# Altium PCB CH32H417QEU-R1.PcbDoc (part 4 of 6)
Units mil, origin at the board's own origin, x right, y up, seen from the top; angles counter-clockwise.
Board outline 4921.26 x 3346.46 mil, 4 copper layers (Top Layer, Layer 1, Layer 2, Bottom Layer), stack 23.756 mil thick; 271 components, 257 nets, 1065 pads, 927 vias.
Unrouted connection lines stored in the file: 149.
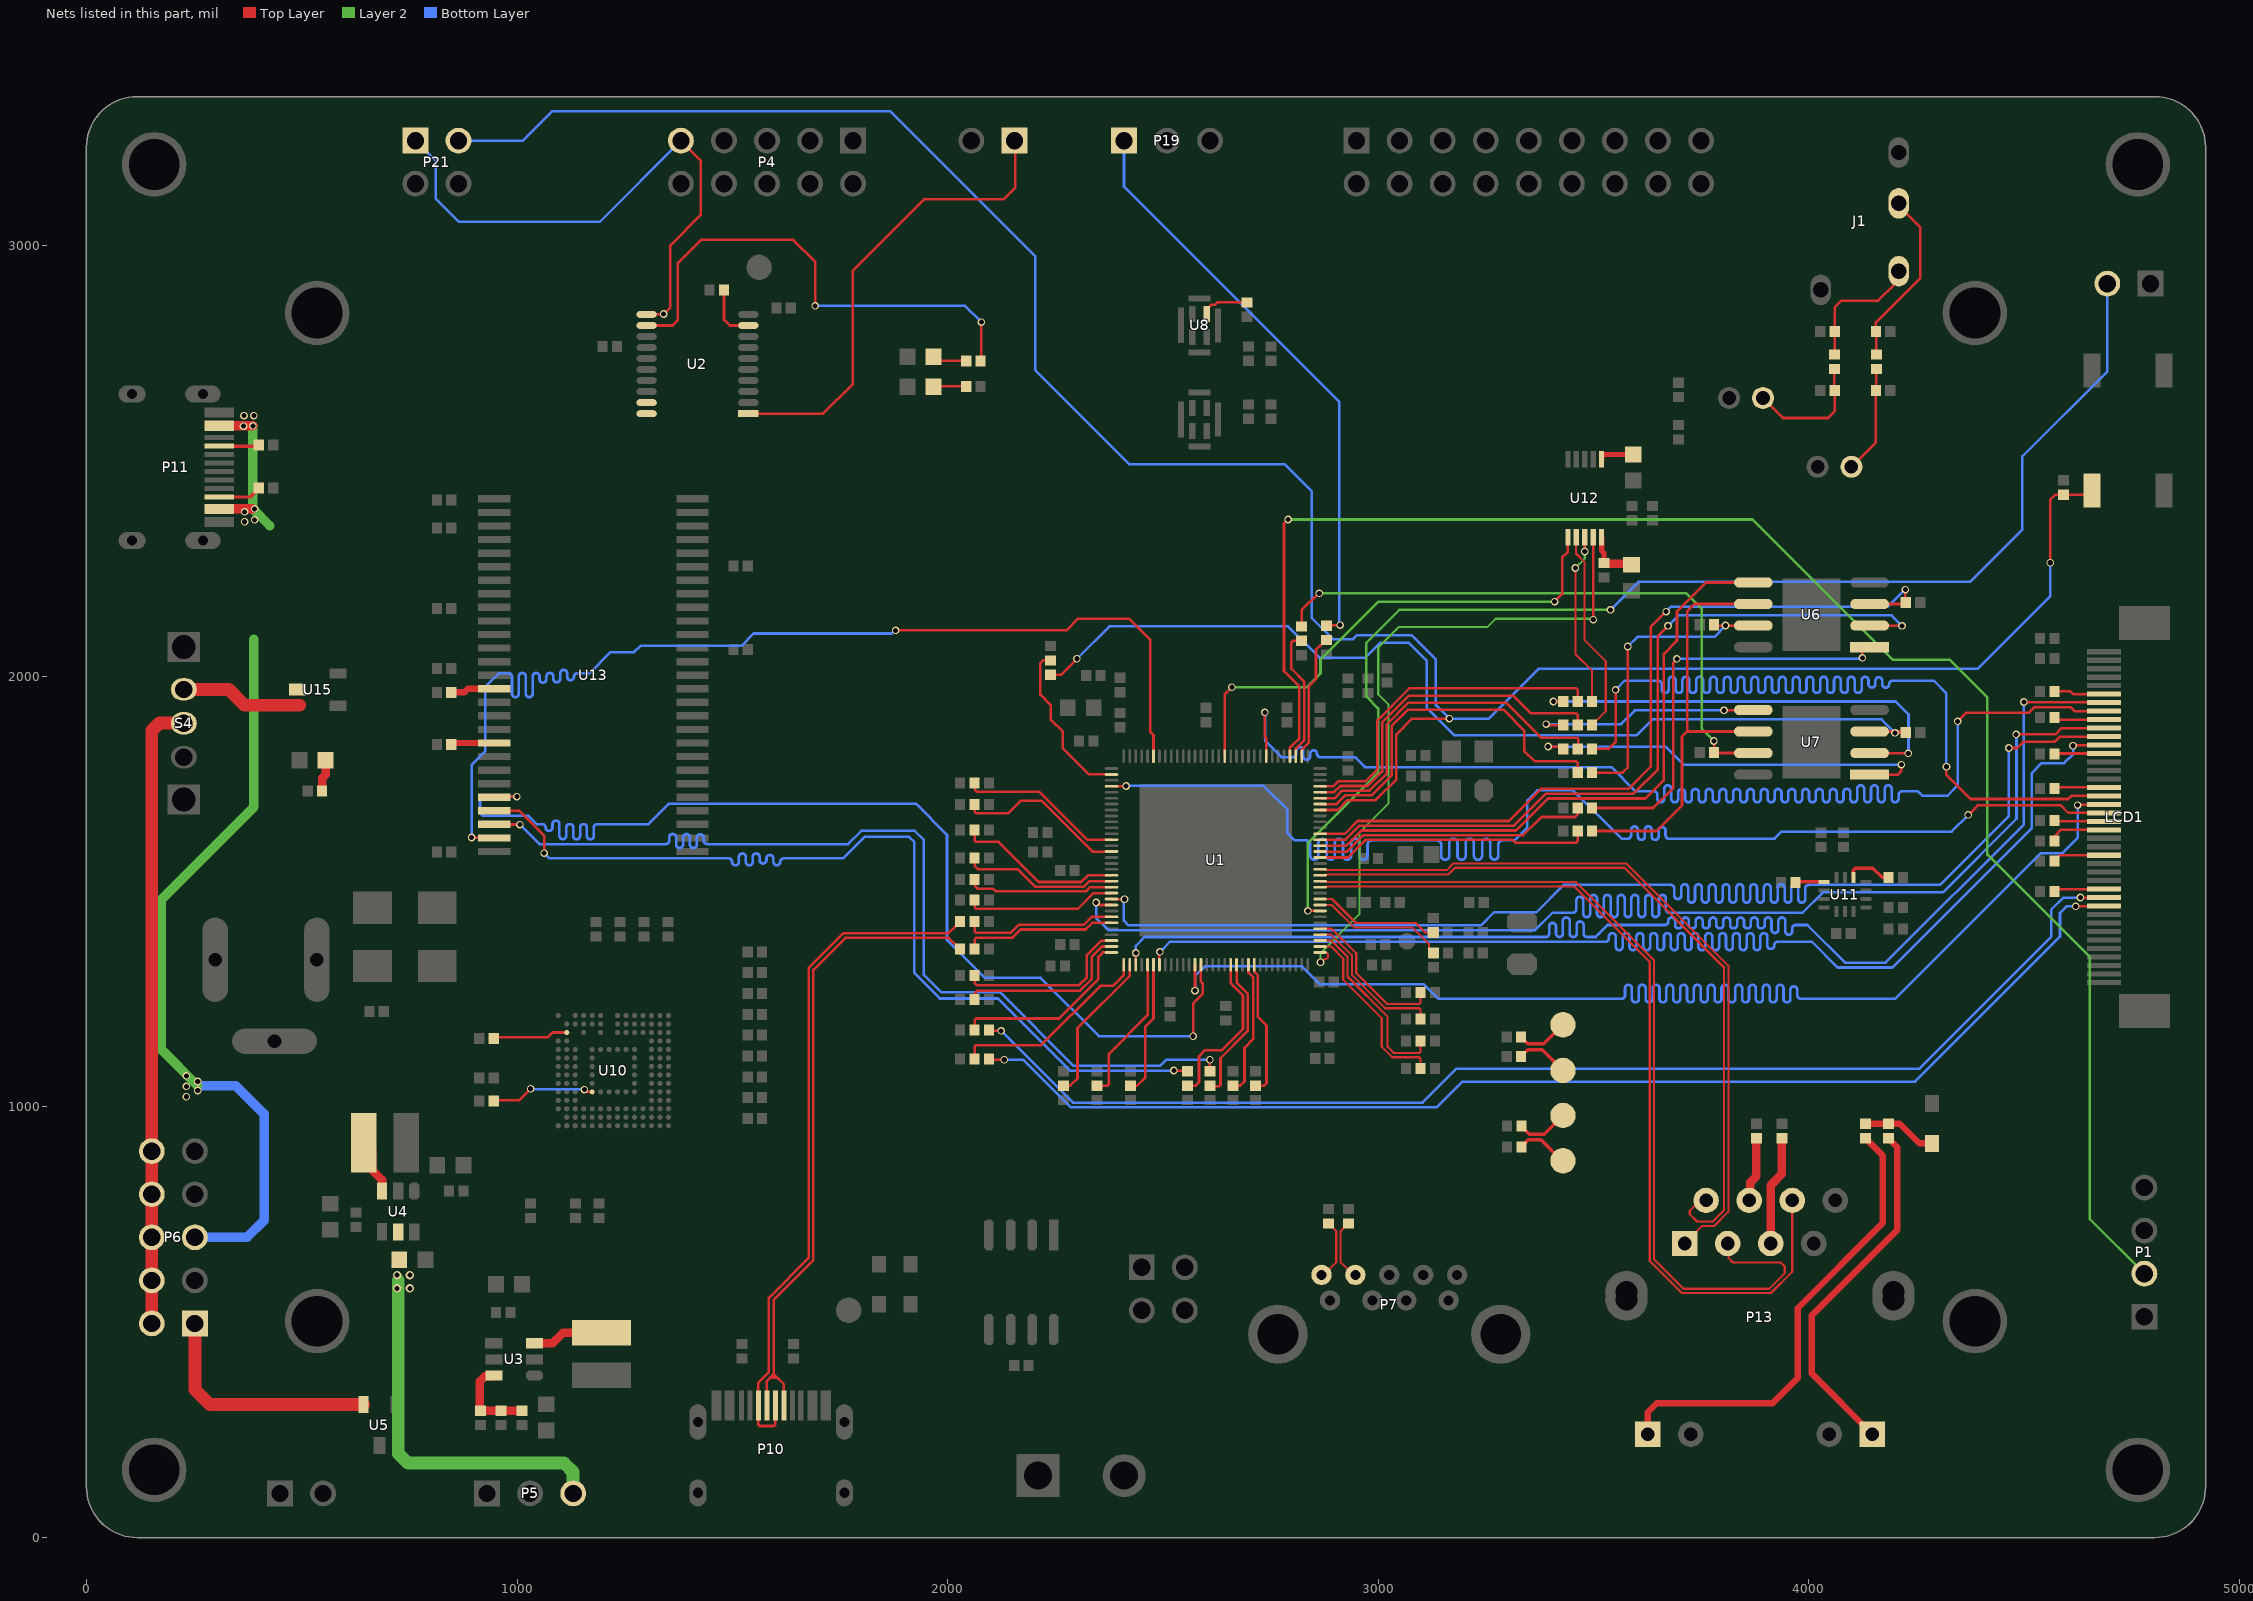
[diagram p6: the nets of this part, all layers, seen from the top]

## Via types
v1: diameter 17.72, hole 11.81, Top Layer to Bottom Layer, tented both sides, 558 vias
v2: diameter 19.68, hole 11.81, Top Layer to Bottom Layer, tented both sides, 320 vias
v3: diameter 28, hole 16, Top Layer to Bottom Layer, tented both sides, 24 vias
v4: diameter 20, hole 12, Top Layer to Bottom Layer, tented both sides, 22 vias
v5: diameter 27.56, hole 15.75, Top Layer to Bottom Layer, tented both sides, 3 vias

## Nets (pads, with @x,y where several pads share a name; then routed paths per layer and width w, separated by ;. In a path a pad name is that pad's centre, name@x,y a point inside that pad or via, vN(x,y) a via of type N, cw(c..) or ccw(c..) an arc to the next point about the centre after c; other vN are vias at no path point) (continued)
LCD_G5: LCD1.23 R66.1 | length 2521.8
  Top Layer w6: R66.1@3496.63,1831.64 3535.02,1831.64 3551.19,1847.82 v1(3551.19,1968.8) ; v1(4319.43,1790.1) 4319.43,1771.26 4375.53,1715.16 4602.27,1715.16 4609.57,1722.46 LCD1.23@4685,1722.46
  Bottom Layer w6: v1(3551.19,1968.8) 3572.24,1989.85 3631.37,1989.85 3650.37,1989.85 cw(c3650.37,1981.85) 3658.37,1981.85 3658.37,1969.58 ccw(c3666.37,1969.58) 3674.37,1969.58 3674.37,1990.98 cw(c3682.37,1990.98) 3690.37,1990.98 3690.37,1969.58 ccw(c3698.37,1969.58) 3706.37,1969.58 3706.37,1990.98 cw(c3714.37,1990.98) 3722.37,1990.98 3722.37,1969.58 ccw(c3730.37,1969.58) 3738.37,1969.58 3738.37,1990.98 cw(c3746.37,1990.98) 3754.37,1990.98 3754.37,1969.58 ccw(c3762.37,1969.58) 3770.37,1969.58 3770.37,1990.98 cw(c3778.37,1990.98) 3786.37,1990.98 3786.37,1969.58 ccw(c3794.37,1969.58) 3802.37,1969.58 3802.37,1990.98 cw(c3810.37,1990.98) 3818.37,1990.98 3818.37,1969.58 ccw(c3826.37,1969.58) 3834.37,1969.58 3834.37,1990.98 cw(c3842.37,1990.98) 3850.37,1990.98 3850.37,1969.58 ccw(c3858.37,1969.58) 3866.37,1969.58 3866.37,1990.98 cw(c3874.37,1990.98) 3882.37,1990.98 3882.37,1969.58 ccw(c3890.37,1969.58) 3898.37,1969.58 3898.37,1990.98 cw(c3906.37,1990.98) 3914.37,1990.98 3914.37,1969.58 ccw(c3922.37,1969.58) 3930.37,1969.58 3930.37,1990.98 cw(c3938.37,1990.98) 3946.37,1990.98 3946.37,1969.58 ccw(c3954.37,1969.58) 3962.37,1969.58 3962.37,1990.98 cw(c3970.37,1990.98) 3978.37,1990.98 3978.37,1969.58 ccw(c3986.37,1969.58) 3994.37,1969.58 3994.37,1990.98 cw(c4002.37,1990.98) 4010.37,1990.98 4010.37,1969.58 ccw(c4018.37,1969.58) 4026.37,1969.58 4026.37,1990.98 cw(c4034.37,1990.98) 4042.37,1990.98 4042.37,1969.58 ccw(c4050.37,1969.58) 4058.37,1969.58 4058.37,1990.98 cw(c4066.37,1990.98) 4074.37,1990.98 4074.37,1969.58 ccw(c4082.37,1969.58) 4090.37,1969.58 4090.37,1990.98 cw(c4098.37,1990.98) 4106.37,1990.98 4106.37,1969.58 ccw(c4114.37,1969.58) 4122.37,1969.58 4122.37,1990.98 cw(c4130.37,1990.98) 4138.37,1990.98 4138.37,1982.05 ccw(c4146.37,1982.05) 4154.37,1982.05 4154.37,1989.85 cw(c4162.37,1989.85) 4170.37,1989.85 4170.37,1981.85 ccw(c4178.37,1981.85) 4186.37,1981.85 cw(c4194.37,1981.85) 4194.37,1989.85 4213.06,1989.85 4290.2,1989.85 4319.43,1960.61 v1(4319.43,1790.1) v1@4319.43,1788.9
LCD_G6: LCD1.22 U1.109 | length 3330.7
  Top Layer w6: v1(2574.46,1270.17) 2574.46,1296.61 U1.109@2574.46,1330.38 ; v1(4624.04,1700.95) 4624.95,1701.86 4684.09,1701.86 LCD1.22@4685,1702.77
  Bottom Layer w6: v1(2574.46,1270.17) 2574.74,1270.45 2574.74,1303.92 2597.2,1326.38 2823.18,1326.38 2864.75,1284.81 3105.86,1284.81 3139.12,1251.55 3562.03,1251.55 3565.03,1251.55 ccw(c3565.03,1259.55) 3573.03,1259.55 3573.03,1275.69 cw(c3581.03,1275.69) 3589.03,1275.69 3589.03,1251.01 ccw(c3597.03,1251.01) 3605.03,1251.01 3605.03,1275.69 cw(c3613.03,1275.69) 3621.03,1275.69 3621.03,1251.01 ccw(c3629.03,1251.01) 3637.03,1251.01 3637.03,1275.69 cw(c3645.03,1275.69) 3653.03,1275.69 3653.03,1251.01 ccw(c3661.03,1251.01) 3669.03,1251.01 3669.03,1275.69 cw(c3677.03,1275.69) 3685.03,1275.69 3685.03,1251.01 ccw(c3693.03,1251.01) 3701.03,1251.01 3701.03,1275.69 cw(c3709.03,1275.69) 3717.03,1275.69 3717.03,1251.01 ccw(c3725.03,1251.01) 3733.03,1251.01 3733.03,1275.69 cw(c3741.03,1275.69) 3749.03,1275.69 3749.03,1251.01 ccw(c3757.03,1251.01) 3765.03,1251.01 3765.03,1275.69 cw(c3773.03,1275.69) 3781.03,1275.69 3781.03,1251.01 ccw(c3789.03,1251.01) 3797.03,1251.01 3797.03,1275.69 cw(c3805.03,1275.69) 3813.03,1275.69 3813.03,1251.01 ccw(c3821.03,1251.01) 3829.03,1251.01 3829.03,1275.69 cw(c3837.03,1275.69) 3845.03,1275.69 3845.03,1251.01 ccw(c3853.03,1251.01) 3861.03,1251.01 3861.03,1275.69 cw(c3869.03,1275.69) 3877.03,1275.69 3877.03,1251.01 ccw(c3885.03,1251.01) 3893.03,1251.01 3893.03,1275.69 cw(c3901.03,1275.69) 3909.03,1275.69 3909.03,1251.01 ccw(c3917.03,1251.01) 3925.03,1251.01 3925.03,1275.69 cw(c3933.03,1275.69) 3941.03,1275.69 3941.03,1251.01 ccw(c3949.03,1251.01) 3957.03,1251.01 3957.03,1272.04 cw(c3965.03,1272.04) 3973.03,1272.04 3973.03,1259.55 ccw(c3981.03,1259.55) 3981.03,1251.55 4004.25,1251.55 4200.99,1251.55 4539.16,1589.72 4588.77,1589.72 4624.04,1624.99 v1(4624.04,1700.95)
LCD_G7: LCD1.21 U1.68 | length 3330.3
  Top Layer w6: U1.68@2380.56,1744.75 U1.68@2380.56,1744.75 2413.86,1744.81 v1(2414.36,1745.31) ; v1(4370.18,1678.44) 4385.4,1693.66 4392.51,1700.77 4584.64,1700.77 4602.33,1683.09 LCD1.21@4685,1683.09
  Bottom Layer w6: v1(2414.36,1745.31) 2414.63,1745.58 2733.47,1745.58 2788.74,1690.31 2788.74,1636.01 2801.03,1623.72 2805.68,1619.07 2832.53,1619.07 cw(c2832.53,1609.57) 2842.03,1609.57 2842.03,1583.57 ccw(c2851.53,1583.57) 2861.03,1583.57 2861.03,1613.22 cw(c2870.53,1613.22) 2880.03,1613.22 2880.03,1583.57 ccw(c2889.53,1583.57) 2899.03,1583.57 2899.03,1613.22 cw(c2908.53,1613.22) 2918.03,1613.22 2918.03,1583.57 ccw(c2927.53,1583.57) 2937.03,1583.57 2937.03,1613.22 cw(c2946.53,1613.22) 2956.03,1613.22 2956.03,1583.57 ccw(c2965.53,1583.57) 2975.03,1583.57 2975.03,1609.57 cw(c2984.53,1609.57) 2984.53,1619.07 3136.53,1619.07 cw(c3136.53,1609.57) 3146.03,1609.57 3146.03,1583.57 ccw(c3155.53,1583.57) 3165.03,1583.57 3165.03,1613.22 cw(c3174.53,1613.22) 3184.03,1613.22 3184.03,1583.57 ccw(c3193.53,1583.57) 3203.03,1583.57 3203.03,1613.22 cw(c3212.53,1613.22) 3222.03,1613.22 3222.03,1583.57 ccw(c3231.53,1583.57) 3241.03,1583.57 3241.03,1613.22 cw(c3250.53,1613.22) 3260.03,1613.22 3260.03,1583.96 ccw(c3269.53,1583.96) 3279.03,1583.96 3279.03,1609.57 cw(c3288.53,1609.57) 3288.53,1619.07 3311.96,1619.07 3316.16,1619.07 3346.42,1649.33 3346.42,1712.24 3369.6,1735.42 3452.66,1735.42 3565,1623.08 3576.04,1623.08 3579.04,1623.08 ccw(c3579.04,1631.08) 3587.04,1631.08 3587.04,1643.59 cw(c3595.04,1643.59) 3603.04,1643.59 3603.04,1628.39 ccw(c3611.04,1628.39) 3619.04,1628.39 3619.04,1643.59 cw(c3627.04,1643.59) 3635.04,1643.59 3635.04,1628.39 ccw(c3643.04,1628.39) 3651.04,1628.39 3651.04,1642.1 cw(c3659.04,1642.1) 3667.04,1642.1 3667.04,1631.08 ccw(c3675.04,1631.08) 3675.04,1623.08 3703.36,1623.08 3920.28,1623.08 3936.6,1639.4 4331.14,1639.4 v1(4370.18,1678.44)
LCD_HS: LCD1.11 R32.1 | length 2892.9
  Top Layer w6: R32.1@2095.96,1178.41 2097.61,1176.76 v1(2124.31,1176.76) ; v1(4630.42,1486.35) 4630.47,1486.29 4684.94,1486.29 LCD1.11@4685,1486.24
  Bottom Layer w6: v1(2124.31,1176.76) 2124.66,1176.76 2291.18,1010.24 3102.71,1010.24 3181.71,1089.24 4257.02,1089.24 4562.76,1394.99 4562.76,1458.04 4591.07,1486.35 v1(4630.42,1486.35)
LCD_R3: LCD1.34 U1.99 | length 3330.6
  Top Layer w6: U1.99@2436.67,1330.38 U1.99@2436.67,1330.38 2436.72,1357.2 v1(2437.09,1357.57) ; v1(4499.1,1940.61) 4499.91,1939.8 4684.19,1939.8 LCD1.34@4685,1938.99
  Bottom Layer w6: v1(2437.09,1357.57) 2437.09,1374.47 2457.36,1394.74 3321.75,1394.74 3388.75,1394.74 ccw(c3388.75,1402.74) 3396.75,1402.74 3396.75,1419.44 cw(c3404.75,1419.44) 3412.75,1419.44 3412.75,1402.74 ccw(c3420.75,1402.74) 3428.75,1402.74 3428.75,1432.08 cw(c3436.75,1432.08) 3444.75,1432.08 3444.75,1402.74 ccw(c3452.75,1402.74) 3460.75,1402.74 3460.75,1422.81 cw(c3468.75,1422.81) 3476.75,1422.81 3476.75,1402.74 ccw(c3484.75,1402.74) 3484.75,1394.74 3504.66,1394.74 3512.54,1402.61 3532.58,1422.66 3662.28,1422.66 3665.28,1422.66 ccw(c3665.28,1430.66) 3673.28,1430.66 3673.28,1432.08 cw(c3681.28,1432.08) 3689.28,1432.08 3689.28,1422.68 ccw(c3697.28,1422.68) 3705.28,1422.68 3705.28,1432.08 cw(c3713.28,1432.08) 3721.28,1432.08 3721.28,1422.68 ccw(c3729.28,1422.68) 3737.28,1422.68 3737.28,1432.08 cw(c3745.28,1432.08) 3753.28,1432.08 3753.28,1422.68 ccw(c3761.28,1422.68) 3769.28,1422.68 3769.28,1432.08 cw(c3777.28,1432.08) 3785.28,1432.08 3785.28,1422.68 ccw(c3793.28,1422.68) 3801.28,1422.68 3801.28,1432.08 cw(c3809.28,1432.08) 3817.28,1432.08 3817.28,1422.68 ccw(c3825.28,1422.68) 3833.28,1422.68 3833.28,1432.08 cw(c3841.28,1432.08) 3849.28,1432.08 3849.28,1422.68 ccw(c3857.28,1422.68) 3865.28,1422.68 3865.28,1432.08 cw(c3873.28,1432.08) 3881.28,1432.08 3881.28,1422.68 ccw(c3889.28,1422.68) 3897.28,1422.68 3897.28,1432.08 cw(c3905.28,1432.08) 3913.28,1432.08 3913.28,1412.03 ccw(c3921.28,1412.03) 3929.28,1412.03 3929.28,1432.08 cw(c3937.28,1432.08) 3945.28,1432.08 3945.28,1408.16 ccw(c3953.28,1408.16) 3961.28,1408.16 3961.28,1414.66 cw(c3969.28,1414.66) 3969.28,1422.66 3996.38,1422.66 3999.29,1419.75 4084.02,1335.02 4178,1335.02 4499.1,1656.11 v1(4499.1,1940.61)
LCD_R4: LCD1.33 U1.40 | length 3328.3
  Top Layer w6: v1(2736.52,1916.47) 2736.84,1916.15 2736.84,1860.04 2739.81,1857.07 U1.40@2739.81,1814.64 ; v1(4345.43,1895.44) 4365.99,1915.99 4511.08,1915.99 4523.08,1927.99 4608.3,1927.99 4616.98,1919.31 LCD1.33@4685,1919.31
  Bottom Layer w6: v1(2736.52,1916.47) 2737.62,1915.37 2737.62,1849.79 2775.09,1812.32 2798.7,1812.32 2801.7,1812.32 ccw(c2801.7,1820.32) 2809.7,1820.32 2809.7,1827.61 cw(c2817.7,1827.61) 2825.7,1827.61 2825.7,1814.67 ccw(c2833.7,1814.67) 2841.7,1814.67 2841.7,1820.32 cw(c2849.7,1820.32) 2857.7,1820.32 ccw(c2865.7,1820.32) 2865.7,1812.32 2921.47,1812.32 2945.87,1812.32 2969.15,1789.04 3541.39,1789.04 3597.37,1733.06 3621.32,1733.06 3640.32,1733.06 cw(c3640.32,1725.06) 3648.32,1725.06 3648.32,1715.67 ccw(c3656.32,1715.67) 3664.32,1715.67 3664.32,1738.99 cw(c3672.32,1738.99) 3680.32,1738.99 3680.32,1715.67 ccw(c3688.32,1715.67) 3696.32,1715.67 3696.32,1730.46 cw(c3704.32,1730.46) 3712.32,1730.46 3712.32,1715.67 ccw(c3720.32,1715.67) 3728.32,1715.67 3728.32,1730.46 cw(c3736.32,1730.46) 3744.32,1730.46 3744.32,1715.67 ccw(c3752.32,1715.67) 3760.32,1715.67 3760.32,1730.46 cw(c3768.32,1730.46) 3776.32,1730.46 3776.32,1715.67 ccw(c3784.32,1715.67) 3792.32,1715.67 3792.32,1730.46 cw(c3800.32,1730.46) 3808.32,1730.46 3808.32,1715.67 ccw(c3816.32,1715.67) 3824.32,1715.67 3824.32,1730.46 cw(c3832.32,1730.46) 3840.32,1730.46 3840.32,1715.67 ccw(c3848.32,1715.67) 3856.32,1715.67 3856.32,1730.46 cw(c3864.32,1730.46) 3872.32,1730.46 3872.32,1715.67 ccw(c3880.32,1715.67) 3888.32,1715.67 3888.32,1730.46 cw(c3896.32,1730.46) 3904.32,1730.46 3904.32,1715.67 ccw(c3912.32,1715.67) 3920.32,1715.67 3920.32,1730.46 cw(c3928.32,1730.46) 3936.32,1730.46 3936.32,1715.67 ccw(c3944.32,1715.67) 3952.32,1715.67 3952.32,1730.46 cw(c3960.32,1730.46) 3968.32,1730.46 3968.32,1715.67 ccw(c3976.32,1715.67) 3984.32,1715.67 3984.32,1730.46 cw(c3992.32,1730.46) 4000.32,1730.46 4000.32,1715.67 ccw(c4008.32,1715.67) 4016.32,1715.67 4016.32,1730.46 cw(c4024.32,1730.46) 4032.32,1730.46 4032.32,1715.67 ccw(c4040.32,1715.67) 4048.32,1715.67 4048.32,1730.46 cw(c4056.32,1730.46) 4064.32,1730.46 4064.32,1715.67 ccw(c4072.32,1715.67) 4080.32,1715.67 4080.32,1730.99 cw(c4088.32,1730.99) 4096.32,1730.99 4096.32,1715.67 ccw(c4104.32,1715.67) 4112.32,1715.67 4112.32,1738.99 cw(c4120.32,1738.99) 4128.32,1738.99 4128.32,1715.67 ccw(c4136.32,1715.67) 4144.32,1715.67 4144.32,1738.99 cw(c4152.32,1738.99) 4160.32,1738.99 4160.32,1715.67 ccw(c4168.32,1715.67) 4176.32,1715.67 4176.32,1738.99 cw(c4184.32,1738.99) 4192.32,1738.99 4192.32,1715.67 ccw(c4200.32,1715.67) 4208.32,1715.67 4208.32,1725.06 cw(c4216.32,1725.06) 4216.32,1733.06 4253.26,1733.06 4258.24,1728.08 4263.23,1723.09 4322.46,1723.09 4345.43,1746.07 v1(4345.43,1895.44)
LCD_R5: LCD1.31 U1.88 | length 3331
  Top Layer w6: v1(2344.85,1474.76) 2348.02,1474.76 2353.62,1469.16 U1.88@2380.56,1469.16 ; v1(4481.24,1865.44) 4572.41,1865.44 4586.91,1879.94 LCD1.31@4685,1879.94
  Bottom Layer w6: v1(2344.85,1474.76) 2344.85,1438.93 2373.08,1410.69 3364.44,1410.69 3404.83,1451.08 3418.65,1451.08 3451.95,1451.08 ccw(c3451.95,1459.08) 3459.95,1459.08 3459.95,1480.18 cw(c3467.95,1480.18) 3475.95,1480.18 3475.95,1449.02 ccw(c3483.95,1449.02) 3491.95,1449.02 3491.95,1484.41 cw(c3499.95,1484.41) 3507.95,1484.41 3507.95,1449.02 ccw(c3515.95,1449.02) 3523.95,1449.02 3523.95,1484.41 cw(c3531.95,1484.41) 3539.95,1484.41 3539.95,1449.02 ccw(c3547.95,1449.02) 3555.95,1449.02 3555.95,1484.41 cw(c3563.95,1484.41) 3571.95,1484.41 3571.95,1449.02 ccw(c3579.95,1449.02) 3587.95,1449.02 3587.95,1484.41 cw(c3595.95,1484.41) 3603.95,1484.41 3603.95,1449.02 ccw(c3611.95,1449.02) 3619.95,1449.02 3619.95,1484.41 cw(c3627.95,1484.41) 3635.95,1484.41 3635.95,1449.02 ccw(c3643.95,1449.02) 3651.95,1449.02 3651.95,1484.41 cw(c3659.95,1484.41) 3667.95,1484.41 3667.95,1459.08 ccw(c3675.95,1459.08) 3675.95,1451.08 3694.95,1451.08 3985.46,1451.08 4032.76,1498.38 4311.12,1498.38 4482.11,1669.38 4482.11,1864.56 v1(4481.24,1865.44)
LCD_R6: LCD1.30 U1.87 | length 3330.3
  Top Layer w6: U1.87@2380.56,1482.94 U1.87@2380.56,1482.94 2410.04,1482.89 v1(2410.56,1482.37) ; v1(4464.26,1833.6) 4483.85,1833.6 4498.3,1848.05 4570.58,1848.05 4582.78,1860.25 4603.37,1860.25 LCD1.30@4685,1860.25
  Bottom Layer w6: v1(2410.56,1482.37) 2409.19,1481 2409.19,1432.56 2420.06,1421.69 3238.54,1421.69 3269.07,1452.22 3366.91,1452.22 3430.4,1515.71 3649.55,1515.71 3679.52,1515.71 cw(c3679.52,1507.71) 3687.52,1507.71 3687.52,1490.89 ccw(c3695.52,1490.89) 3703.52,1490.89 3703.52,1509.17 cw(c3711.52,1509.17) 3719.52,1509.17 3719.52,1482.57 ccw(c3727.52,1482.57) 3735.52,1482.57 3735.52,1509.17 cw(c3743.52,1509.17) 3751.52,1509.17 3751.52,1482.57 ccw(c3759.52,1482.57) 3767.52,1482.57 3767.52,1509.17 cw(c3775.52,1509.17) 3783.52,1509.17 3783.52,1482.57 ccw(c3791.52,1482.57) 3799.52,1482.57 3799.52,1509.17 cw(c3807.52,1509.17) 3815.52,1509.17 3815.52,1482.57 ccw(c3823.52,1482.57) 3831.52,1482.57 3831.52,1509.17 cw(c3839.52,1509.17) 3847.52,1509.17 3847.52,1482.57 ccw(c3855.52,1482.57) 3863.52,1482.57 3863.52,1509.17 cw(c3871.52,1509.17) 3879.52,1509.17 3879.52,1482.57 ccw(c3887.52,1482.57) 3895.52,1482.57 3895.52,1509.17 cw(c3903.52,1509.17) 3911.52,1509.17 3911.52,1482.57 ccw(c3919.52,1482.57) 3927.52,1482.57 3927.52,1509.17 cw(c3935.52,1509.17) 3943.52,1509.17 3943.52,1482.57 ccw(c3951.52,1482.57) 3959.52,1482.57 3959.52,1509.17 cw(c3967.52,1509.17) 3975.52,1509.17 3975.52,1482.57 ccw(c3983.52,1482.57) 3991.52,1482.57 3991.52,1507.71 cw(c3999.52,1507.71) 3999.52,1515.71 4002.52,1515.71 4304.46,1515.71 4464.26,1675.51 v1(4464.26,1833.6)
LCD_R7: LCD1.29 U1.103 | length 3330.9
  Top Layer w6: U1.103@2491.78,1330.38 U1.103@2491.78,1330.38 2491.84,1359.34 v1(2492.77,1360.27) ; v1(4613.46,1838.98) 4614.25,1839.77 4684.2,1839.77 LCD1.29@4685,1840.57
  Bottom Layer w6: v1(2492.77,1360.27) 2516.24,1383.74 3524.49,1383.74 3527.49,1383.74 ccw(c3527.49,1391.74) 3535.49,1391.74 3535.49,1395.68 cw(c3543.49,1395.68) 3551.49,1395.68 3551.49,1372.05 ccw(c3559.49,1372.05) 3567.49,1372.05 3567.49,1395.68 cw(c3575.49,1395.68) 3583.49,1395.68 3583.49,1372.05 ccw(c3591.49,1372.05) 3599.49,1372.05 3599.49,1395.68 cw(c3607.49,1395.68) 3615.49,1395.68 3615.49,1372.05 ccw(c3623.49,1372.05) 3631.49,1372.05 3631.49,1395.68 cw(c3639.49,1395.68) 3647.49,1395.68 3647.49,1372.05 ccw(c3655.49,1372.05) 3663.49,1372.05 3663.49,1395.68 cw(c3671.49,1395.68) 3679.49,1395.68 3679.49,1372.05 ccw(c3687.49,1372.05) 3695.49,1372.05 3695.49,1395.68 cw(c3703.49,1395.68) 3711.49,1395.68 3711.49,1372.05 ccw(c3719.49,1372.05) 3727.49,1372.05 3727.49,1395.68 cw(c3735.49,1395.68) 3743.49,1395.68 3743.49,1372.05 ccw(c3751.49,1372.05) 3759.49,1372.05 3759.49,1395.68 cw(c3767.49,1395.68) 3775.49,1395.68 3775.49,1372.05 ccw(c3783.49,1372.05) 3791.49,1372.05 3791.49,1395.68 cw(c3799.49,1395.68) 3807.49,1395.68 3807.49,1372.05 ccw(c3815.49,1372.05) 3823.49,1372.05 3823.49,1395.68 cw(c3831.49,1395.68) 3839.49,1395.68 3839.49,1372.05 ccw(c3847.49,1372.05) 3855.49,1372.05 3855.49,1395.68 cw(c3863.49,1395.68) 3871.49,1395.68 3871.49,1372.05 ccw(c3879.49,1372.05) 3887.49,1372.05 3887.49,1395.68 cw(c3895.49,1395.68) 3903.49,1395.68 3903.49,1375.09 ccw(c3911.49,1375.09) 3919.49,1375.09 3919.49,1375.74 cw(c3927.49,1375.74) 3927.49,1383.74 3990.71,1383.74 4006.91,1383.74 4066.62,1324.02 4193.91,1324.02 4517.07,1647.18 4517.07,1774.81 4540.62,1798.36 4592.92,1798.36 4613.46,1818.9 v1(4613.46,1838.98)
LCD_VS: LCD1.10 R36.1 | length 2861.3
  Top Layer w6: R36.1@2095.96,1111.04 2097.37,1109.63 v1(2131.46,1109.63) ; v1(4619.71,1465.83) 4620.43,1466.55 LCD1.10@4685,1466.55
  Bottom Layer w6: v1(2131.46,1109.63) 2176.23,1109.63 2286.62,999.24 3135.62,999.24 3195.28,1058.9 4246.5,1058.9 4583.13,1395.53 4583.13,1450.77 4598.2,1465.83 v1(4619.71,1465.83)
LDO_3V3: C40.2 P5.3 U4.5 | length 875.7
  Layer 2 w30: 724.22,597.71 724.22,195.41 746.49,173.14 1109.13,173.14 1130.43,151.83 P5.3@1130.43,102.71
  other v2: 721.42,578.85 751.22,578.85 721.42,609.57 751.22,609.57
LED_CON: R83.1 U2.12 | length 1167.5
  Top Layer w6: U2.12@1300.92,2814.87 1361.35,2814.87 1373.73,2827.26 1373.73,2959.91 1427.71,3013.88 1641.28,3013.88 1692.24,2962.93 1692.24,2860.49 v1(1692.4,2860.33) ; R83.1@2076.52,2732.6 2078.29,2734.37 v1(2078.29,2822.59)
  Bottom Layer w6: v1(1692.4,2860.33) 2040.54,2860.33 v1(2078.29,2822.59)
Link_5V: P6.5 P11.A4 P11.B4 | length 2170.2
  Top Layer w22: P11.B4@308.88,2388.97 v1@386.66,2388.97 ; P11.A4@308.88,2581.88 386.28,2581.88 v1(386.43,2581.73)
  Layer 2 w22: 258.67,1049.13 174.36,1133.44 174.36,1481.85 389.11,1696.6 389.11,2086.6 ; v1(386.43,2581.73) 386.43,2389.2 386.66,2388.97 425.82,2349.81
  Bottom Layer w22: P6.5@251.84,697.38 373.32,697.38 412.64,736.69 412.64,983.85 347.36,1049.13 258.67,1049.13
  other v1: 232.13,1023.89 258.67,1038.37 232.13,1048.02 258.67,1059.13 232.13,1072.16 367.32,2358.98 390.66,2363.48 367.32,2382.18 390.66,2388.97 364.9,2581.16 365.91,2605.63 388.91,2605.63
LOUT: C67.2 J1.3 R120.2 | length 398.4
  Top Layer w6: R120.2@4156.47,2747.36 4156.47,2800.31 C67.2@4155.49,2801.3 4155.49,2821.76 4258.85,2925.13 4258.85,3042.07 J1.3@4216.12,3084.8
MDIRN: P13.6 U1.12 | length 2081.4
  Top Layer w5: U1.12@2864.81,1510.5 2877.76,1510.5 2879.65,1512.39 3454.72,1512.39 3630.31,1336.8 3630.31,642.37 3704.69,567.99 3912,567.99 3961.34,617.33 P13.6@3961.34,782.99
MDIRP: P13.3 U1.13 | length 2081.5
  Top Layer w5: U1.13@2864.81,1524.28 2877.76,1524.28 2879.65,1522.39 3458.87,1522.39 3640.31,1340.95 3640.31,646.51 3708.83,577.99 3907.85,577.99 3944,614.14 3944,629.56 3934.57,638.99 3929.97,638.99 ; P13.3@3811.34,682.99 3812.97,681.36 3812.97,649.96 3823.94,638.99 3860.64,638.99 ; 3860.71,639.02 3930.04,639.02
MDITN: P13.2 U1.14 | length 1758.5
  Top Layer w5: U1.14@2864.81,1538.06 2877.76,1538.06 2879.65,1539.95 3162.8,1539.95 3178.26,1555.41 3571.63,1555.41 3803,1324.04 3803,760.51 3776.48,733.99 3740.04,733.99 3723.47,750.57 3723.47,759.23 3747.23,782.99 P13.2@3761.34,782.99
MDITP: P13.1 U1.15 | length 1757.5
  Top Layer w5: U1.15@2864.81,1551.84 2877.76,1551.84 2879.65,1549.95 3158.66,1549.95 3174.12,1565.41 3575.77,1565.41 3813,1328.19 3813,756.37 3780.62,723.99 3752.34,723.99 P13.1@3711.34,682.99
NetC33_2: C33.2 R85.2 R86.1 U3.6 | length 204.4
  Top Layer w20: U3.6@946.12,376.36 944.31,374.55 925.47,374.55 913.76,362.83 913.76,294.63 R85.2@962.88,294.63 C33.2@1012,294.63
NetC44_1: C44.1 P7.8 | length 144.7
  Top Layer w5.1: C44.1@2930.52,729.62 2929.53,729.62 2920.27,720.36 2920.27,719.37 2912.57,711.67 2912.57,639.41 2941.92,610.06 P7.8@2946.89,610.06
NetC45_1: C45.1 P7.9 | length 144.7
  Top Layer w5.1: P7.9@2868.15,610.06 2873.12,610.06 2902.47,639.41 2902.47,711.67 2894.76,719.37 2894.76,720.36 2885.5,729.62 C45.1@2884.52,729.62
NetC51_2: C51.2 U10.C2 | length 175.3
  Top Layer w6: C51.2@945.78,1159.44 947.92,1161.59 1070.89,1161.59 1082.32,1173.01 U10.C2@1115.46,1173.01
NetC56_2: C56.2 P13.5 | length 255.2
  Top Layer w20: P13.5@3911.34,682.99 3911.34,818.38 3937.09,844.12 C56.2@3937.09,927.53
NetC57_2: C57.2 P13.4 | length 151.5
  Top Layer w20: P13.4@3861.34,782.99 3863.59,785.24 3863.59,824.93 3878.09,839.43 C57.2@3878.09,927.53
NetC63_2: C63.2 C64.2 U12.5 | length 127.9
  Top Layer w12: U12.5@3518.87,2323.12 3518.87,2290.85 3523.86,2285.86 C63.2@3523.86,2263.04
  Top Layer w20: C63.2@3523.86,2263.04 3525.67,2261.23 3586.25,2261.23 C64.2@3588.09,2259.39
NetC65_2: C65.2 U12.6 | length 84.4
  Top Layer w12: U12.6@3518.87,2504.22 3518.87,2515.29 3518.96,2515.39 C65.2@3592.2,2515.39
NetC66_2: C66.2 R120.1 R122.1 | length 251.1
  Top Layer w6: C66.2@4098.85,2486.69 4155.49,2543.33 R122.1@4155.49,2663.42 4156.47,2664.41 R120.1@4156.47,2713.9
NetC68_2: C68.2 R123.1 R125.1 | length 291
  Top Layer w6: C68.2@3893.39,2646.43 3939.79,2600.03 4044.54,2600.03 4059.92,2615.41 R125.1@4059.92,2663.42 4058.94,2664.41 R123.1@4058.94,2713.9
NetC77_2: C77.2 P15.1 | length 124
  Top Layer w8: C77.2@3332.41,907.6 3332.41,908.58 3340.22,916.39 3341.2,916.39 3348.65,923.84 3377.87,923.84 3426.55,875.16 P15.1@3428.94,875.16
NetC78_2: C78.2 P16.1 | length 122.9
  Top Layer w8: C78.2@3332.41,956.16 3332.41,955.17 3350.42,937.16 3385.68,937.16 P16.1@3428.94,980.42
NetC79_2: C79.2 P17.1 | length 124.3
  Top Layer w8: C79.2@3331.71,1116.81 3331.71,1117.8 3339.53,1125.61 3340.51,1125.61 3347.77,1132.87 3380.91,1132.87 P17.1@3428.94,1084.84
NetC80_2: C80.2 P18.1 | length 122.7
  Top Layer w8: C80.2@3331.71,1162.71 3331.71,1161.73 3339.53,1153.92 3340.51,1153.92 3347.68,1146.75 3384.73,1146.75 P18.1@3428.94,1190.96
NetD1_2: D1.2 R83.2 | length 79.7
  Top Layer w6: D1.2@1967.35,2742.31 1977.05,2732.6 R83.2@2043.06,2732.6
NetD2_2: D2.2 R84.2 | length 76.2
  Top Layer w6: D2.2@1967.35,2672.23 1968.48,2673.36 R84.2@2043.06,2673.36
NetD3_2: D3.2 R87.1 | length 74.2
  Top Layer w20: R87.1@547.34,1734.09 547.34,1763.59 555.39,1771.64 D3.2@555.39,1804.93
NetD10_2: D10.2 R108.1 R109.1 | length 172.9
  Top Layer w15: R108.1@4131.44,960.99 R109.1@4184.59,960.99 4211.12,960.99 4256.43,915.68 D10.2@4285.54,915.68
NetL1_1: L1.1 U3.3 | length 165.5
  Top Layer w20: U3.3@1040.61,451.16 1082.31,451.16 1106.52,475.37 L1.1@1196.12,475.37
NetL2_1: L2.1 U4.3 | length 130.5
  Top Layer w20: L2.1@643.92,917.27 663.45,897.74 663.45,853.75 686.61,830.59 U4.3@686.61,804.46
NetLCD1_12: LCD1.12 R117.1 | length 117.5
  Top Layer w6: R117.1@4570,1500 4575.92,1505.92 LCD1.12@4685,1505.92
NetLCD1_16: LCD1.16 R118.1 | length 120.3
  Top Layer w6: R118.1@4570,1571.98 4578.81,1580.8 4579.8,1580.8 4583.66,1584.66 LCD1.16@4685,1584.66
NetLCD1_19: LCD1.19 R119.1 | length 132.1
  Top Layer w6: R119.1@4570,1618 4570,1628.3 4585.91,1644.22 4616.94,1644.22 4617.44,1643.72 LCD1.19@4685,1643.72
NetLCD1_20: LCD1.20 R116.1 | length 115.7
  Top Layer w6: R116.1@4570,1665 4571.6,1663.4 LCD1.20@4685,1663.4
NetLCD1_24: LCD1.24 R115.1 | length 115.9
  Top Layer w6: R115.1@4570,1740 4572.14,1742.14 LCD1.24@4685,1742.14
NetLCD1_28: LCD1.28 R112.1 | length 115.4
  Top Layer w6: R112.1@4570,1820 4570.88,1820.88 LCD1.28@4685,1820.88
NetLCD1_32: LCD1.32 R113.1 | length 117.2
  Top Layer w6: R113.1@4570,1905 4575.38,1899.62 LCD1.32@4685,1899.62
NetLCD1_35: LCD1.35 R114.1 | length 117.6
  Top Layer w6: R114.1@4570,1965 4607.4,1965 4613.72,1958.68 LCD1.35@4685,1958.68
NetP6_2: P6.2 P6.4 P6.6 P6.8 P6.10 S4.1 | length 1449
  Top Layer w30: P6.2@151.84,497.38 P6.4@151.84,597.38 P6.6@151.84,697.38 P6.8@151.84,797.38 151.84,1873.86 169.42,1891.44 S4.1@217.11,1891.44
NetP11_A5: P11.A5 R88.1 | length 92.5
  Top Layer w8: P11.A5@308.88,2534.64 397.78,2534.64 R88.1@400.33,2537.19
NetP11_B5: P11.B5 R89.1 | length 100.6
  Top Layer w8: P11.B5@308.88,2416.53 380.66,2416.53 400.33,2436.21 R89.1@400.33,2437.19
NetP13_9: P13.9 R108.2 | length 1087.9
  Top Layer w15: P13.9@3625.71,240 3625.71,291.16 3646.76,312.21 3915.5,312.21 3974.05,370.76 3974.05,532.91 4171.82,730.67 4171.82,887.15 R108.2@4131.44,927.53
NetP13_12: P13.12 R109.2 | length 836.3
  Top Layer w15: P13.12@4147.36,240 4007.08,380.28 4007.08,516.39 4205.27,714.57 4205.27,906.85 R109.2@4184.59,927.53
NetR96_1: R96.1 U8.2 | length 110.7
  Top Layer w6: U8.2@2601.73,2841.57 2601.73,2852.4 2612.43,2863.1 2621.32,2863.1 2626.68,2868.46 R96.1@2695,2868.46
NetR106_1: R106.1 U10.K5 | length 243.3
  Top Layer w6: R106.1@945.77,1014.23 946.87,1015.33 1004.62,1015.33 v1(1031.62,1042.33) ; v1(1156.5,1040.3) 1161.58,1035.22 U10.K5@1174.52,1035.22
  Bottom Layer w6: v1(1031.62,1042.33) 1032.64,1041.31 1155.48,1041.31 v1(1156.5,1040.3)
NetR110_2: R110.2 U11.1 | length 66.2
  Top Layer w8: R110.2@3968.96,1521.06 3970.5,1522.59 U11.1@4034.56,1522.59
NetR111_2: R111.2 U11.12 | length 109.8
  Top Layer w8: U11.12@4103.45,1532.43 4103.45,1549.77 4108.14,1554.46 4148.71,1554.46 4169.95,1533.22 R111.2@4185.18,1533.22
NetR126_2: R126.2 U13.15 | length 103.5
  Top Layer w15: R126.2@847.4,1962.77 877.33,1962.77 885.84,1971.27 U13.15@947.4,1971.27
NetR127_1: R127.1 U13.19 | length 101.5
  Top Layer w15: R127.1@847.4,1841.77 850.92,1845.29 U13.19@947.4,1845.29
NetS4_2: S4.2 U15.3 | length 283.5
  Top Layer w30: S4.2@226.26,1969.78 330.52,1969.78 367.39,1932.92 494.47,1932.92
NRST: C19.2 P21.2 S2.1 U1.25 | length 5602.9
  Top Layer w6: U1.25@2864.81,1689.64 2905.99,1689.64 2928.86,1712.5 2994.01,1712.5 3042.12,1760.62 3042.12,1865.52 3078.59,1901.99 v1(3165.06,1901.99) ; v1(4560.55,2263.79) 4560.55,2410.22 4572.23,2421.9 S2.1@4661.27,2421.9
  Bottom Layer w6: P21.2@864.13,3244.09 1013.78,3244.09 1082.32,3312.64 1866.24,3312.64 1931.87,3247.01 2203.01,2975.87 2203.01,2711.89 2422.62,2492.28 2783.22,2492.28 2845.19,2430.31 2845.19,2136.15 2894.77,2086.58 2941.81,2086.58 2951,2095.77 3077.49,2095.77 3133.55,2039.72 3133.55,1933.5 v1(3165.06,1901.99) 3256.75,1901.99 3372.04,2017.28 4391.72,2017.28 4560.55,2186.11 v1(4560.55,2263.79)
NRST0: P4.9 P21.1 U2.11 | length 1320.2
  Top Layer w6: U2.11@1300.92,2840.47 1301.45,2840.99 v1@1340.03,2840.99 ; v1(1340.55,2841.52) 1355.93,2856.9 1355.93,3000.69 1426.21,3070.97 1426.21,3198.41 P4.9@1380.53,3244.09
  Bottom Layer w6: P21.1@764.13,3244.09 811.41,3196.81 811.41,3109.02 864.74,3055.69 1192.12,3055.69 P4.9@1380.53,3244.09
OTG_FS_DM: P10.A7 P10.B7 R47.1 | length 1591.9
  Top Layer w6: P10.A7@1599.92,306.76 1599.92,262.7 1596.41,259.18 1564.07,259.18 1560.55,262.7 P10.B7@1560.55,306.76 1560.55,359.86 1584.99,384.3 1584.99,556.64 1677.24,648.89 1677.24,1323.15 1758,1403.9 2002.48,1403.9 2019.24,1420.66 2020.22,1420.66 2029.03,1429.47 R47.1@2029.03,1430.46
OTG_FS_DP: P10.A6 P10.B6 R49.1 | length 1546
  Top Layer w6: P10.A6@1580.24,306.76 1580.24,363.99 1588.16,371.91 ; P10.B6@1619.61,306.76 1619.61,356.13 1603.82,371.91 ; R49.1@2029.03,1366.35 2029.03,1367.33 2020.22,1376.14 2019.24,1376.14 2002.48,1392.9 1762.56,1392.9 1688.24,1318.59 1688.24,644.33 1595.99,552.08 1595.99,379.75 ; 1588.16,371.91 1595.99,371.91 ; 1588.16,371.91 1595.99,379.75 ; 1595.99,371.91 1603.82,371.91 ; 1595.99,371.91 1595.99,379.75 ; 1595.99,379.75 1603.82,371.91
PA0: R64.2 R65.2 U1.34 | length 294.8
  Top Layer w6: U1.34@2822.49,1814.64 2822.55,1814.69 2822.55,1829.8 2838.86,1846.11 2838.86,1977.5 2855.36,1993.99 2855.36,2062.28 2863.71,2070.63 2865.18,2070.63 2878.83,2084.28 R64.2@2879.81,2084.28
PA1: R74.2 R75.2 U1.35 | length 310.4
  Top Layer w6: U1.35@2808.71,1814.64 2808.77,1814.69 2808.77,1832.47 2827.86,1851.57 2827.86,1987.84 2797.98,2017.73 2797.98,2079.04 2801.49,2082.55 R74.2@2822.18,2082.55
PA2: P1.2 U1.36 | length 3861.9
  Top Layer w6: v1(2790.54,2364.29) 2781.09,2354.84 2781.09,2012.38 2816.86,1976.6 2816.86,1856.12 2800.84,1840.1 2800.45,1840.1 2794.93,1834.58 U1.36@2794.93,1814.64
  Layer 2 w6: v1(2790.54,2364.29) 3869,2364.29 4194.65,2038.64 4327.02,2038.64 4414.5,1951.17 4414.5,1586.14 4652.66,1347.98 4652.66,739.34 P1.2@4779,613
PA11: R46.2 R47.2 U1.90 | length 357.5
  Top Layer w6: R47.2@2062.5,1430.46 2062.5,1408.02 2066.18,1404.34 2146.17,1404.34 2164.93,1423.11 2316.1,1423.11 2334.6,1441.6 U1.90@2380.56,1441.6
PA12: R48.2 R49.2 U1.91 | length 356.7
  Top Layer w6: R49.2@2062.5,1366.35 2062.5,1388.78 2067.06,1393.34 2150.72,1393.34 2169.49,1412.11 2320.66,1412.11 2336.38,1427.83 U1.91@2380.56,1427.83
PA14: R25.2 R26.2 U1.94 | length 410.3
  Top Layer w6: R26.2@2062.5,1305.04 2062.5,1288.04 2067.51,1283.03 2305.12,1283.03 2323.31,1301.22 2323.31,1353.03 2356.77,1386.49 U1.94@2380.56,1386.49
PA15: R28.2 R30.2 U1.95 | length 407.8
  Top Layer w6: R30.2@2062.5,1249.4 2062.5,1263.67 2069.02,1270.19 2307.84,1270.19 2334.31,1296.66 2334.31,1348.47 2358.55,1372.71 U1.95@2380.56,1372.71
PB3: R50.2 R51.2 U1.115 | length 379.5
  Top Layer w6: R50.2@2557.2,1049.48 2575.49,1049.48 2583.71,1057.7 2583.71,1117.79 2598.12,1132.2 2636.99,1132.2 2685.83,1181.04 2685.83,1258.88 2657.14,1287.57 U1.115@2657.14,1330.38
PB4: R52.2 R53.2 U1.116 | length 341.9
  Top Layer w6: R52.2@2609.77,1049.48 2611.45,1047.8 2630.04,1047.8 2633.55,1051.32 2633.55,1113.21 2696.83,1176.48 2696.83,1263.44 2670.92,1289.35 U1.116@2670.92,1330.38
PB6: R76.2 R77.2 U1.118 | length 314.9
  Top Layer w6: R76.2@2662.33,1049.48 2679.33,1049.48 2689.28,1059.43 2689.28,1137.42 2709.42,1157.57 2709.42,1301.35 2698.48,1312.3 U1.118@2698.48,1330.38
PB7: R79.2 R80.2 U1.119 | length 315
  Top Layer w6: U1.119@2712.26,1330.38 2712.31,1330.33 2712.31,1314.02 2720.42,1305.91 2720.42,1209.41 2740.54,1189.29 2740.54,1054.98 2735.05,1049.48 R79.2@2714.9,1049.48
PB13: R72.2 R73.2 U1.66 | length 383.9
  Top Layer w6: R72.2@2238.71,2037.21 2221.71,2037.21 2215.2,2030.69 2215.2,1957.73 2239.23,1933.69 2239.23,1900.32 2267.65,1871.89 2267.65,1832.6 2327.94,1772.31 U1.66@2380.56,1772.31
PC0: R62.2 R63.2 U1.26 | length 857.5
  Top Layer w6: U1.26@2864.81,1703.42 2902.95,1703.42 2923.04,1723.5 2960.12,1723.5 2971.89,1723.5 2977.45,1723.5 2984.61,1723.5 3031.12,1770.02 3031.12,1777.18 3031.12,1782.73 3031.12,1884.28 3069.53,1922.68 3290.35,1922.68 3338.93,1874.1 3338.93,1827.13 3363.12,1802.95 3459.65,1802.95 3463.16,1799.44 R62.2@3463.16,1776.64
PC1: R66.2 R67.2 U1.27 | length 817
  Top Layer w6: U1.27@2864.81,1717.2 2899.02,1717.2 2916.33,1734.5 2955.56,1734.5 2967.34,1734.5 2972.9,1734.5 2980.05,1734.5 3020.12,1774.57 3020.12,1781.73 3020.12,1787.29 3020.12,1888.83 3070.26,1938.97 3296.49,1938.97 3377.84,1857.63 3461.24,1857.63 3464.76,1854.11 3464.76,1833.24 R66.2@3463.16,1831.64
PC2: R68.2 R69.2 U1.28 | length 800.3
  Top Layer w6: U1.28@2864.81,1730.98 2897.25,1730.98 2911.77,1745.5 2951,1745.5 2962.78,1745.5 2968.34,1745.5 2975.5,1745.5 3009.12,1779.13 3009.12,1786.29 3009.12,1791.85 3009.12,1893.39 3070.45,1954.72 3314.34,1954.72 3354.73,1914.33 3459.65,1914.33 3463.16,1910.81 R68.2@3463.16,1886.64
PC3: R70.2 R71.2 U1.29 | length 788.3
  Top Layer w6: U1.29@2864.81,1744.75 2895.47,1744.75 2907.22,1756.5 2970.94,1756.5 2998.12,1783.69 2998.12,1897.95 3072.61,1972.43 3459.65,1972.43 3463.16,1968.91 R70.2@3463.16,1941.64
PC6: R13.2 R14.2 U1.83 | length 388.1
  Top Layer w6: R14.2@2062.5,1642.71 2062.5,1619.02 2066.01,1615.51 2118.04,1615.51 2210.97,1522.58 2310.04,1522.58 2325.52,1538.06 U1.83@2380.56,1538.06
PC6_305: R81.2 U2.9 | length 130.4
  Top Layer w6: R81.2@1480.59,2896.76 1480.59,2828.56 1494.28,2814.87 U2.9@1537.16,2814.87
PC7: R16.2 R18.2 U1.84 | length 361
  Top Layer w6: R18.2@2062.5,1577.71 2062.5,1560.08 2070.31,1552.27 2162.53,1552.27 2203.22,1511.58 2316.24,1511.58 2328.94,1524.28 U1.84@2380.56,1524.28
PC8: R19.2 R21.2 U1.85 | length 342.5
  Top Layer w6: R21.2@2062.5,1528.7 2062.5,1513.97 2069.19,1507.27 2105.69,1507.27 2112.39,1500.58 2320.95,1500.58 2330.87,1510.5 U1.85@2380.56,1510.5
PC9: R23.2 R24.2 U1.86 | length 351.7
  Top Layer w6: R24.2@2062.5,1481.08 2062.5,1464.09 2066.3,1460.29 2302.14,1460.29 2338.57,1496.72 U1.86@2380.56,1496.72
PC10: R32.2 R34.2 U1.96 | length 437.7
  Top Layer w6: R34.2@2062.5,1179.39 R34.2@2062.5,1178.41 2062.5,1201.55 2066.54,1205.59 2258.79,1205.59 2349.93,1296.73 2349.93,1348.54 2360.33,1358.93 U1.96@2380.56,1358.93
PC11: R36.2 R38.2 U1.97 | length 468.5
  Top Layer w6: R38.2@2062.5,1111.04 2062.5,1140.04 2066.01,1143.56 2216.8,1143.56 2354.7,1281.45 2384.2,1281.45 2409.11,1306.36 U1.97@2409.11,1330.38
PC12: R40.2 R41.2 U1.98 | length 353.8
  Top Layer w6: R40.2@2268.97,1049.48 2284.57,1049.48 2301.59,1066.5 2301.59,1183.28 2422.89,1304.58 U1.98@2422.89,1330.38
PC13: P2.2 U1.8 | length 3015.3
  Top Layer w6: v1(2836.55,1455.38) U1.8@2864.81,1455.38
  Layer 2 w6: v1(2836.55,1455.38) 2836.55,1612.69 2999.88,1776.02 2999.88,1925.64 2972.27,1953.25 2972.27,2078.08 3048.73,2154.54 v1(3539.34,2154.54)
  Bottom Layer w6: v1(3539.34,2154.54) 3604.22,2219.43 4374.46,2219.43 4495.84,2340.8 4495.84,2511.16 4693,2708.33 P2.2@4693,2912
PC14: R1.2 R2.2 U1.9 | length 315.7
  Top Layer w5: U1.9@2864.81,1469.16 2892.24,1469.16 2944.26,1417.14 3078.64,1417.14 3118.1,1377.68 3118.1,1367.34 3127.41,1358.03 R2.2@3128.4,1358.03
PC15: R3.2 R4.2 U1.10 | length 295
  Top Layer w5: U1.10@2864.81,1482.94 2892.6,1482.94 2916.85,1458.69 2948.4,1427.14 3087.27,1427.14 3109.08,1405.33 R4.2@3127.68,1405.33
PD0_305: U2.19
PD1_305: U2.20
PD2: R42.2 R43.2 U1.101 | length 343.5
  Top Layer w6: R42.2@2346.96,1049.48 2370.89,1049.48 2374.41,1053 2374.41,1123.35 2464.22,1213.17 U1.101@2464.22,1330.38
PD3: R44.2 R45.2 U1.102 | length 311.9
  Top Layer w6: R44.2@2424.94,1049.48 2440.3,1049.48 2458.98,1068.16 2458.98,1186.9 2478,1205.93 U1.102@2478,1330.38
PE3: R54.2 R55.2 U1.2 | length 431.9
  Top Layer w5: U1.2@2864.81,1372.71 2890.47,1372.71 2918.7,1344.47 2918.7,1295.45 3008.02,1206.13 3008.02,1139.63 3032.15,1115.5 3095.26,1115.5 3098.18,1112.57 R54.2@3098.18,1089.51
PE4: R56.2 R57.2 U1.3 | length 434.5
  Top Layer w5: U1.3@2864.81,1386.49 2890.83,1386.49 2928.7,1348.61 2928.7,1302.86 3021.82,1209.75 3021.82,1139.98 3036.3,1125.5 3094.88,1125.5 3098.18,1128.81 R56.2@3098.18,1152.84
PE5: R58.2 R59.2 U1.4 | length 354.8
  Top Layer w5: U1.4@2864.81,1400.27 2891.19,1400.27 2938.7,1352.75 2938.7,1314.43 2938.7,1307.01 3016.31,1229.4 3023.73,1229.4 3095.26,1229.4 3098.18,1226.47 R58.2@3098.18,1203.86
PE6: R60.2 R61.2 U1.5 | length 357
  Top Layer w5: U1.5@2864.81,1414.05 2891.55,1414.05 2948.7,1356.9 2948.7,1311.15 3020.45,1239.4 3095.26,1239.4 3098.18,1242.33 R60.2@3098.18,1265.63
PF0: R9.2 R10.2 U1.77 | length 382.7
  Top Layer w6: R10.2@2062.5,1751.73 R10.2@2062.5,1752.71 2062.5,1737.4 2067.98,1731.92 2212.77,1731.92 2323.95,1620.74 U1.77@2380.56,1620.74
PF2: R11.2 R12.2 U1.79 | length 397.7
  Top Layer w6: R12.2@2062.5,1702.71 2062.5,1685.72 2066.3,1681.92 2140.63,1681.92 2169.95,1711.24 2217.9,1711.24 2335.96,1593.18 U1.79@2380.56,1593.18
PF6: R5.2 R6.2 U1.17 | length 642.7
  Top Layer w6: U1.17@2864.81,1579.4 2929.36,1579.4 2970.13,1620.17 3312.11,1620.17 3318.36,1613.92 3459.65,1613.92 3463.16,1617.43 R5.2@3463.16,1640.86
PF7: R7.2 R8.2 U1.18 | length 648.9
  Top Layer w6: U1.18@2864.81,1593.18 2927.59,1593.18 2965.57,1631.17 3336.7,1631.17 3379.02,1673.49 3457.26,1673.49 3463.16,1679.39 R7.2@3463.16,1694.28
PIN_5V: P6.1 U5.2 | length 560.9
  Top Layer w30: P6.1@247.2,497.09 251.84,492.45 251.84,344.07 287.21,308.71 U5.2@643.14,308.71
PIOC_IO0: P19.1 R65.1 | length 1365
  Top Layer w6: R65.1@2879.81,2117.75 2881.06,2118.99 v1(2911.34,2118.99)
  Bottom Layer w6: P19.1@2409.45,3244.09 2409.45,3137.37 2909.78,2637.04 2909.78,2120.54 v1(2911.34,2118.99)
QSPI_CS: R7.1 U6.1 | length 979.1
  Top Layer w6: R7.1@3496.63,1694.28 3638.28,1694.28 3685.3,1741.31 3685.3,2031.2 3693.46,2039.35 v1(3693.46,2040.57) ; v1(4124.21,2042.96) 4124.21,2059 4133.21,2068 U6.1@4141,2068
  Bottom Layer w6: v1(3693.46,2040.57) 4118.66,2040.57 4121.04,2042.96 v1(4124.21,2042.96)
QSPI_SCK: R5.1 U6.6 U7.6 | length 1003.6
  Top Layer w6: R5.1@3496.63,1640.86 3645.85,1640.86 3705.26,1700.27 3705.26,1860 3717.26,1872 ; U7.6@3871,1872 3717.26,1872 ; U6.6@3871,2168 3734.11,2168 3717.26,2151.15 3717.26,1872
QSPI_SCSXN: R67.1 U7.1 | length 967.6
  Top Layer w6: v1(3394.45,1837.04) 3424.3,1837.04 R67.1@3429.7,1831.64 ; U7.1@4141,1772 4206.84,1772 4214.88,1780.03 v1(4214.88,1795.2)
  Bottom Layer w6: v1(3394.45,1837.04) 3667.2,1837.04 3709.04,1795.2 v1(4214.88,1795.2)
QSPI_SIO0: U1.19 U6.5 | length 1470.9
  Top Layer w6: U1.19@2864.81,1606.96 2925.81,1606.96 2961.02,1642.17 3319.42,1642.17 3393.71,1716.46 3620.58,1716.46 3663.15,1759.03 3663.15,2052.29 3693.7,2082.84 3693.7,2150.82 3760.88,2218 U6.5@3871,2218
QSPI_SIO1: U1.20 U6.2 | length 1834.2
  Top Layer w6: U1.20@2864.81,1620.74 2924.03,1620.74 2956.46,1653.17 3314.72,1653.17 3389.11,1727.56 3592.37,1727.56 3649.08,1784.27 3649.08,2093.57 v1(3672.94,2117.43) ; U6.2@4141,2118 4141.35,2117.65 4215.96,2117.65 v1(4216.31,2117.31)
  Bottom Layer w6: v1(3672.94,2117.43) 3697.25,2141.74 4191.87,2141.74 v1(4216.31,2117.31)
QSPI_SIO2: R93.1 U1.21 U6.3 | length 1900.4
  Top Layer w6: U1.21@2864.81,1634.52 2922.26,1634.52 2951.91,1664.17 3303.46,1664.17 3377.88,1738.59 3581.14,1738.59 3632.66,1790.12 3632.66,2114.51 v1(3668.46,2150.31) ; U6.3@4141,2168 4222,2168 R93.1@4225,2171 4224.14,2171.86 v1(4224.14,2201.57)
  Bottom Layer w6: v1(3668.46,2150.31) 3680.21,2162.06 4183.25,2162.06 4222.76,2201.57 v1(4224.14,2201.57)
QSPI_SIO3: R62.1 R92.2 U6.7 | length 707.7
  Top Layer w6: R62.1@3496.63,1776.64 3567.64,1776.64 3579.36,1788.36 v1(3579.36,2069.48) ; R92.2@3780,2119.88 3781.87,2118 v1(3806.47,2118) U6.7@3871,2118
  Bottom Layer w6: v1(3579.36,2069.48) 3601.83,2091.95 3780.42,2091.95 v1(3806.47,2118)
QSPI_SIOX0: R69.1 U7.5 | length 535.5
  Top Layer w6: v1(3389.92,1889.08) 3392.35,1886.64 R69.1@3429.7,1886.64 ; v1(3802.73,1921.18) 3803.14,1921.59 3870.59,1921.59 U7.5@3871,1922
  Bottom Layer w6: v1(3389.92,1889.08) 3563.97,1889.08 3596.08,1921.18 v1(3802.73,1921.18)
QSPI_SIOX1: R71.1 U7.2 | length 1041.2
  Top Layer w6: v1(3406.55,1941.64) R71.1@3429.7,1941.64 ; U7.2@4141,1822 4141.35,1821.65 4230.48,1821.65 v1(4230.83,1821.31)
  Bottom Layer w6: v1(3406.55,1941.64) 4201.64,1941.64 4231.39,1911.89 4231.39,1821.87 v1(4230.83,1821.31)
QSPI_SIOX2: R73.1 R95.1 U7.3 | length 2343
  Top Layer w6: R73.1@2238.71,2003.74 2238.84,2003.61 2262.92,2003.61 2300,2040.7 v1(2300,2040.91) ; U7.3@4141,1872 R95.1@4223,1872 ; v1(4200.07,1868.84) 4219.84,1868.84 R95.1@4223,1872 ; R95.1@4225,1870 R95.1@4223,1872
  Bottom Layer w6: v1(2300,2040.91) 2300.21,2040.91 2375.32,2116.01 2790.53,2116.01 2863.24,2043.3 2970.63,2043.3 3005.62,2078.28 3070.06,2078.28 3112.68,2035.67 3112.68,1926.97 3176.7,1862.95 3599.42,1862.95 3636.59,1900.11 4168.8,1900.11 v1(4200.07,1868.84)
QSPI_SIOX3: R75.1 R94.2 U7.7 | length 1443.4
  Top Layer w6: R75.1@2822.18,2116.01 2822.18,2154 2860.79,2192.6 v1(2863.05,2192.6) ; R94.2@3771,1822 U7.7@3871,1822 ; R94.2@3780,1823 v1@3780,1849.77
  Layer 2 w6: v1(2863.05,2192.6) 3715.58,2192.6 3750.76,2157.43 3750.76,1878.55 v1(3779.48,1849.82)
ROUT: C69.2 J1.2 R123.2 | length 321.4
  Top Layer w6: R123.2@4058.94,2747.36 4059.92,2748.35 C69.2@4059.92,2802.28 ; C69.2@4059.92,2801.3 4059.92,2856.7 4075.67,2872.44 4160.83,2872.44 4200.77,2912.39 4200.77,2942.14 J1.2@4212.79,2954.16
RST: P3.1 U2.1 | length 1101.3
  Top Layer w6: U2.1@1537.16,2610.17 1710.62,2610.17 1779.77,2679.32 1779.77,2942.1 1945.88,3108.21 2130.71,3108.21 2157.38,3134.89 P3.1@2157.38,3244.68
SAI_FS: R70.1 U12.3 | length 406.6
  Top Layer w5: v1(3457.75,2251.75) 3457.75,2051.94 3496.63,2013.07 R70.1@3496.63,1941.64 ; v1(3479.5,2289.99) U12.3@3479.5,2323.12
  Layer 2 w5: v1(3457.75,2251.75) 3479.5,2273.5 v1(3479.5,2289.99)
SAI_MCLK: U1.1 U12.4 | length 1574.8
  Top Layer w5: U1.1@2864.81,1358.93 2865.06,1358.68 2879.58,1358.68 2882.91,1355.35 2882.91,1346.82 2879.98,1343.9 2875.51,1343.9 2867.68,1336.07 v1(2865.87,1336.07) ; U12.4@3499.18,2323.12 3499.41,2322.89 v1@3499.41,2131.71
  Layer 2 w5: v1(2865.87,1336.07) 2865.87,1357.15 2956.19,1447.48 2956.19,1637.07 3023.51,1704.39 3023.51,1934.96 3000.08,1958.39 3000.08,2066.9 3048.06,2114.88 3253.89,2114.88 3272.84,2133.83 3497.22,2133.83 v1(3499.34,2131.71)
SAI_SCK: R68.1 U12.2 | length 478.4
  Top Layer w5: U12.2@3459.81,2323.12 3459.18,2322.49 3459.18,2285.36 3479.27,2265.28 3479.27,2084.07 3528.21,2035.13 3528.21,1919.21 3496.63,1887.63 R68.1@3496.63,1886.64
SAI_SD: U1.47 U12.1 | length 1179.8
  Top Layer w6: U1.47@2643.36,1814.64 2643.36,1958.09 v1(2660.03,1974.76) ; v1(3409.49,2173.64) 3427.06,2191.21 3427.06,2276.22 3440.13,2289.29 U12.1@3440.13,2323.12
  Layer 2 w6: v1(2660.03,1974.76) 2833.8,1974.76 2865.86,2006.82 2865.86,2038.79 3000.71,2173.64 v1(3409.49,2173.64)
SDRAM_A0: U1.110 U13.23 | length 2608.9
  Top Layer w6: U13.23@947.4,1719.3 948.15,1720.06 998.76,1720.06 v1(999.52,1720.81) ; v1(2570.24,1164.32) 2570.24,1240.69 2592.32,1262.77 2592.32,1287.05 2588.24,1291.13 U1.110@2588.24,1330.38
  Bottom Layer w6: v1(999.52,1720.81) 919.08,1720.81 913.98,1715.72 913.98,1682.46 920.43,1676.01 1026.71,1676.01 1036.98,1665.73 1045.68,1657.04 1058.37,1657.04 cw(c1058.37,1649.04) 1066.37,1649.04 ccw(c1074.37,1649.04) 1082.37,1649.04 1082.37,1657.04 cw(c1090.37,1657.04) 1098.37,1657.04 1098.37,1630.06 ccw(c1106.37,1630.06) 1114.37,1630.06 1114.37,1649.04 cw(c1122.37,1649.04) 1130.37,1649.04 1130.37,1629.54 ccw(c1138.37,1629.54) 1146.37,1629.54 1146.37,1649.04 cw(c1154.37,1649.04) 1162.37,1649.04 1162.37,1629.54 ccw(c1170.37,1629.54) 1178.37,1629.54 1178.37,1649.04 cw(c1186.37,1649.04) 1186.37,1657.04 1221.37,1657.04 1305.45,1657.04 1352.81,1704.4 1926.08,1704.4 1998.42,1632.06 1998.42,1387.66 2086.39,1299.69 2215.6,1299.69 2350.96,1164.32 v1(2570.24,1164.32)
SDRAM_A1: R50.1 U13.24 | length 2230.6
  Top Layer w6: U13.24@947.4,1687.81 1005.23,1687.82 1063.01,1630.04 v1(1063.01,1589.36) ; v1(2525.18,1084.65) 2555.5,1084.65 R50.1@2557.2,1082.95
  Bottom Layer w6: v1(1063.01,1589.36) 1075.07,1577.3 1472.29,1577.3 1491.29,1577.3 cw(c1491.29,1569.3) 1499.29,1569.3 1499.29,1569.19 ccw(c1507.29,1569.19) 1515.29,1569.19 1515.29,1580.68 cw(c1523.29,1580.68) 1531.29,1580.68 1531.29,1569.19 ccw(c1539.29,1569.19) 1547.29,1569.19 1547.29,1580.68 cw(c1555.29,1580.68) 1563.29,1580.68 1563.29,1573.43 ccw(c1571.29,1573.43) 1579.29,1573.43 1579.29,1577.31 cw(c1587.29,1577.31) 1595.29,1577.31 1595.29,1569.3 ccw(c1603.29,1569.3) 1611.29,1569.3 cw(c1619.29,1569.3) 1619.29,1577.3 1665.84,1577.3 1757.26,1577.3 1807.26,1627.3 1910.8,1627.3 1922.59,1615.51 1922.59,1311.4 1982.01,1251.98 2116.74,1251.98 2284.33,1084.39 v1@2525.18,1084.39
SDRAM_A2: R52.1 U13.25 | length 2270.6
  Top Layer w6: U13.25@947.4,1656.31 947.62,1656.08 1006.33,1656.08 v1(1006.56,1655.86) ; v1(2609.08,1109.8) 2609.08,1083.63 R52.1@2609.77,1082.95
  Bottom Layer w6: v1(1006.56,1655.86) 1051.88,1610.54 1342.56,1610.54 1345.56,1610.54 ccw(c1345.56,1618.54) 1353.56,1618.54 1353.56,1625.97 cw(c1361.56,1625.97) 1369.56,1625.97 1369.56,1609.51 ccw(c1377.56,1609.51) 1385.56,1609.51 1385.56,1625.97 cw(c1393.56,1625.97) 1401.56,1625.97 1401.56,1609.51 ccw(c1409.56,1609.51) 1417.56,1609.51 1417.56,1625.31 cw(c1425.56,1625.31) 1433.56,1625.31 1433.56,1618.54 ccw(c1441.56,1618.54) 1441.56,1610.54 1474.3,1610.54 1768.66,1610.54 1799.65,1641.53 1923.49,1641.53 1944.93,1620.09 1944.93,1306.6 1985.01,1266.52 2121.12,1266.52 2292.25,1095.39 2493.36,1095.39 2507.78,1109.8 v1(2609.08,1109.8)
SDRAM_A3: U1.59 U13.26 | length 2610.5
  Top Layer w6: v1(894.57,1625.84) 895.09,1625.33 946.88,1625.33 U13.26@947.4,1624.81 ; v1(1879.21,2106.96) 2275.99,2106.96 2303.11,2134.08 2420.78,2134.08 2470.7,2084.16 2470.7,1870.8 2478,1863.49 U1.59@2478,1814.64
  Bottom Layer w6: v1(894.57,1625.84) 894.57,1794.52 926.09,1826.04 926.09,1975.58 957.56,2007.05 961.29,2007.05 980.29,2007.05 cw(c980.29,1999.05) 988.29,1999.05 988.29,1959.64 ccw(c996.29,1959.64) 1004.29,1959.64 1004.29,1999.95 cw(c1012.29,1999.95) 1020.29,1999.95 1020.29,1959.9 ccw(c1028.29,1959.9) 1036.29,1959.9 1036.29,1999.95 cw(c1044.29,1999.95) 1052.29,1999.95 1052.29,1993.26 ccw(c1060.29,1993.26) 1068.29,1993.26 1068.29,1999.95 cw(c1076.29,1999.95) 1084.29,1999.95 1084.29,1994.29 ccw(c1092.29,1994.29) 1100.29,1994.29 1100.29,2007.05 cw(c1108.29,2007.05) 1116.29,2007.05 1116.29,1999.05 ccw(c1124.29,1999.05) 1132.29,1999.05 cw(c1140.29,1999.05) 1140.29,2007.05 1161.35,2007.05 1167.97,2007.05 1217.15,2056.23 1272.04,2056.23 1286.87,2071.07 1520.78,2071.07 1549.3,2099.58 1869.84,2099.58 1877.22,2106.96 v1(1879.21,2106.96)